# Altium PCB busanaliz2.PcbDoc (part 1 of 2)
Units mm, origin at the board's own origin, x right, y up, seen from the top; angles counter-clockwise.
Board outline 118.11 x 70.87 mm, 4 copper layers (Component Side, Ground Plane, Power Plane, Solder Side), stack 0.93 mm thick; 120 components, 93 nets, 597 pads, 207 vias.
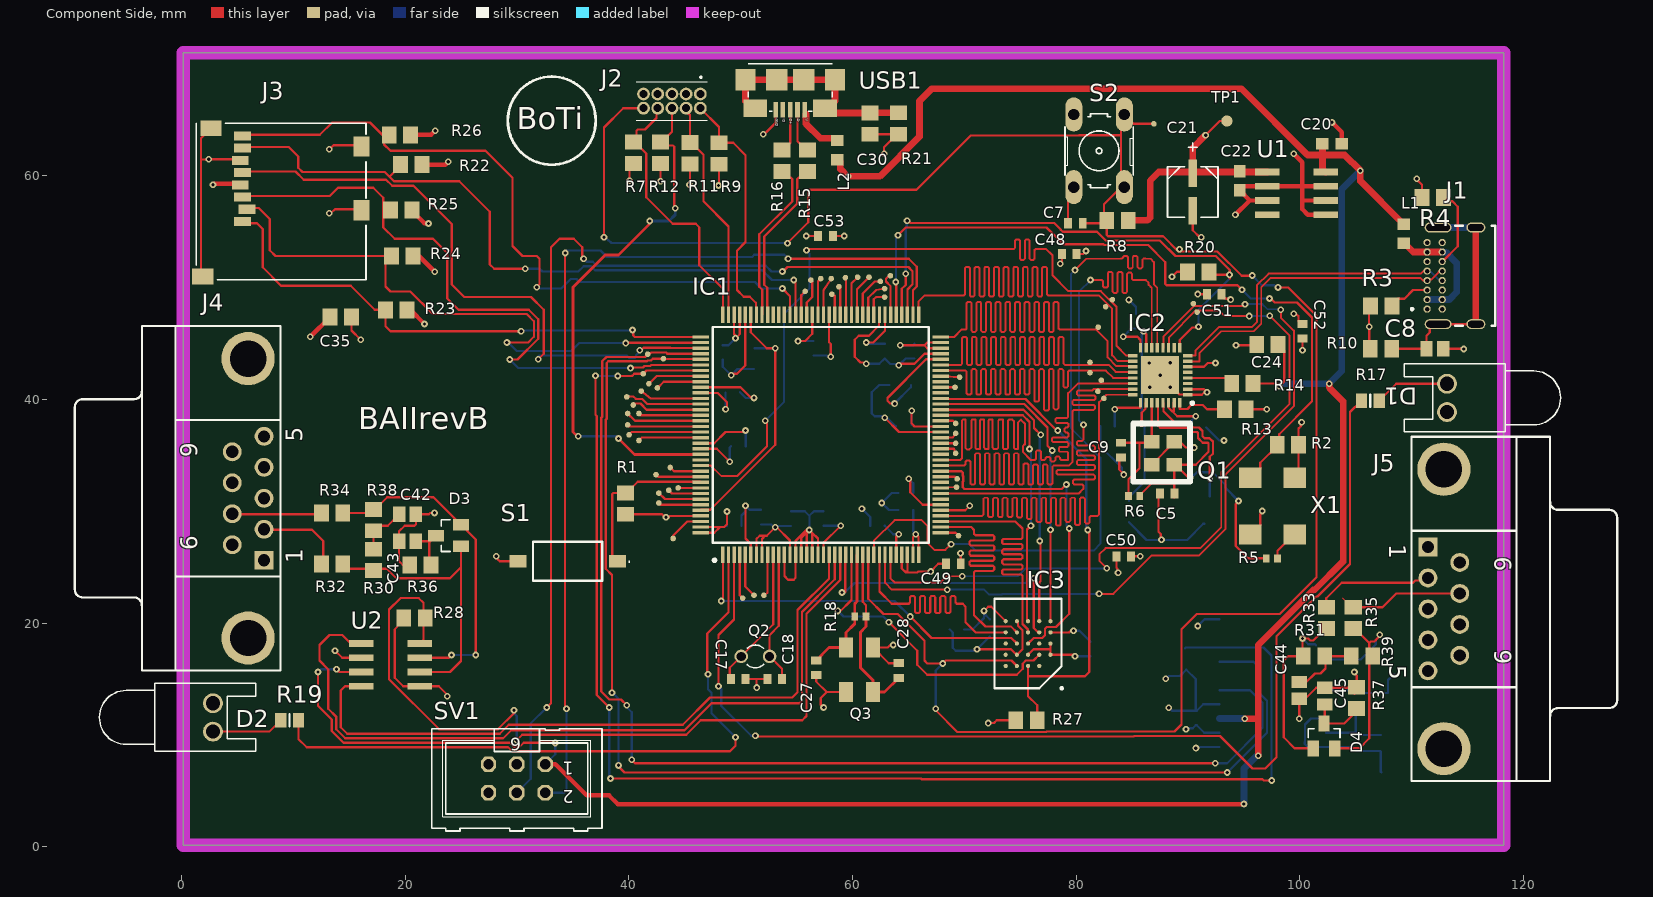
[diagram p0: Component Side view]
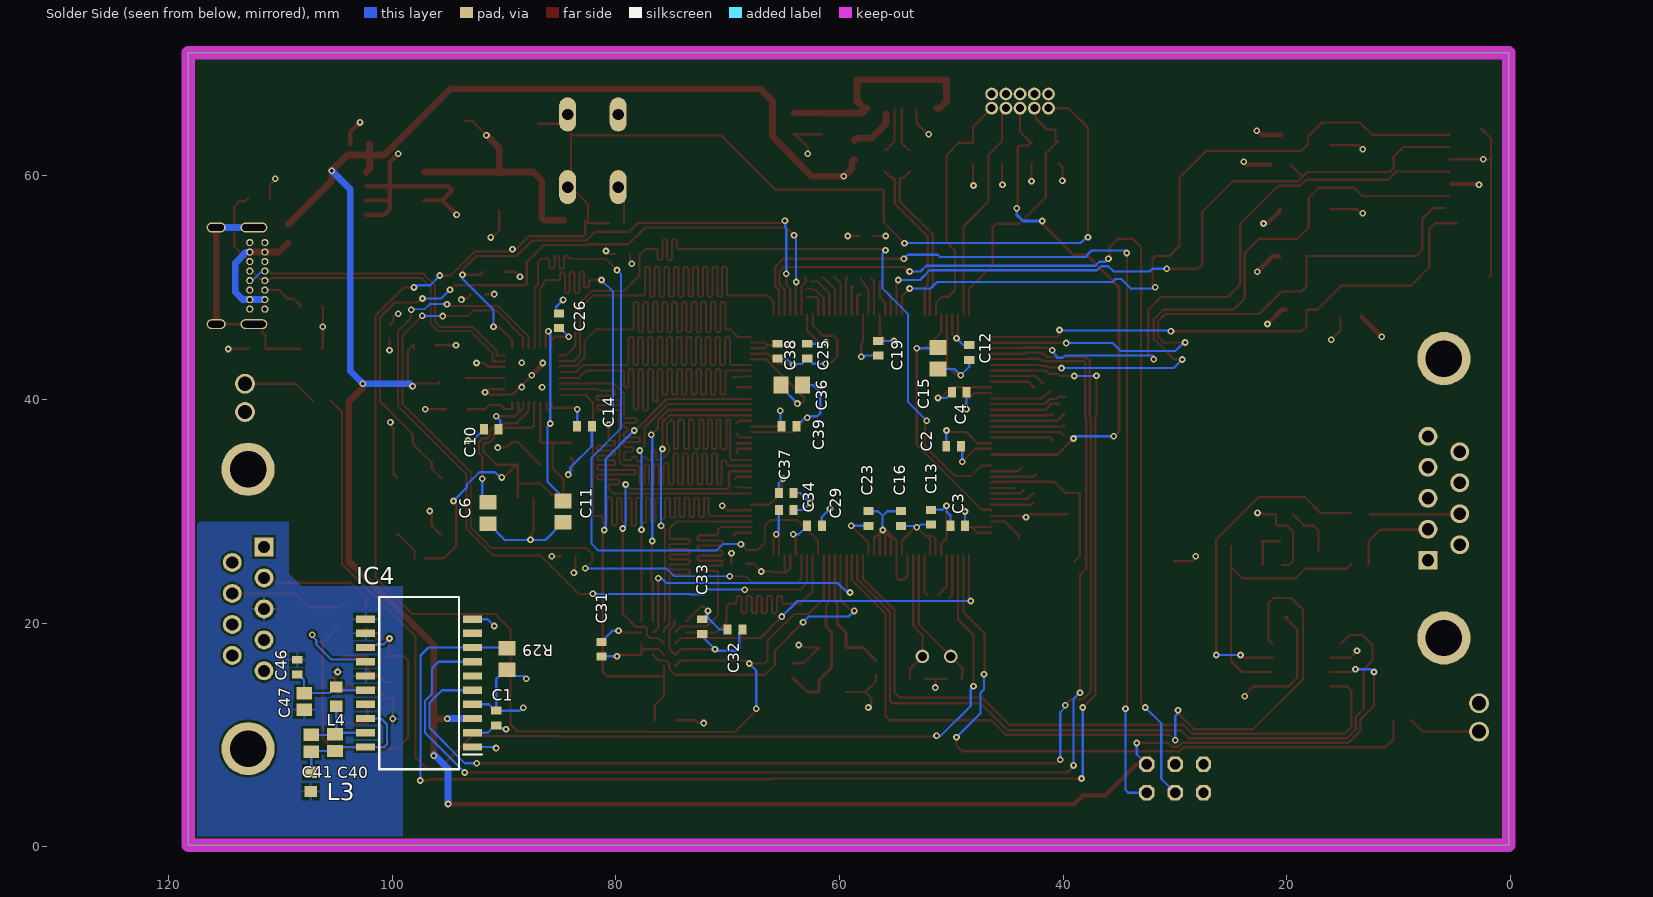
[diagram p1: Solder Side view, seen from below]
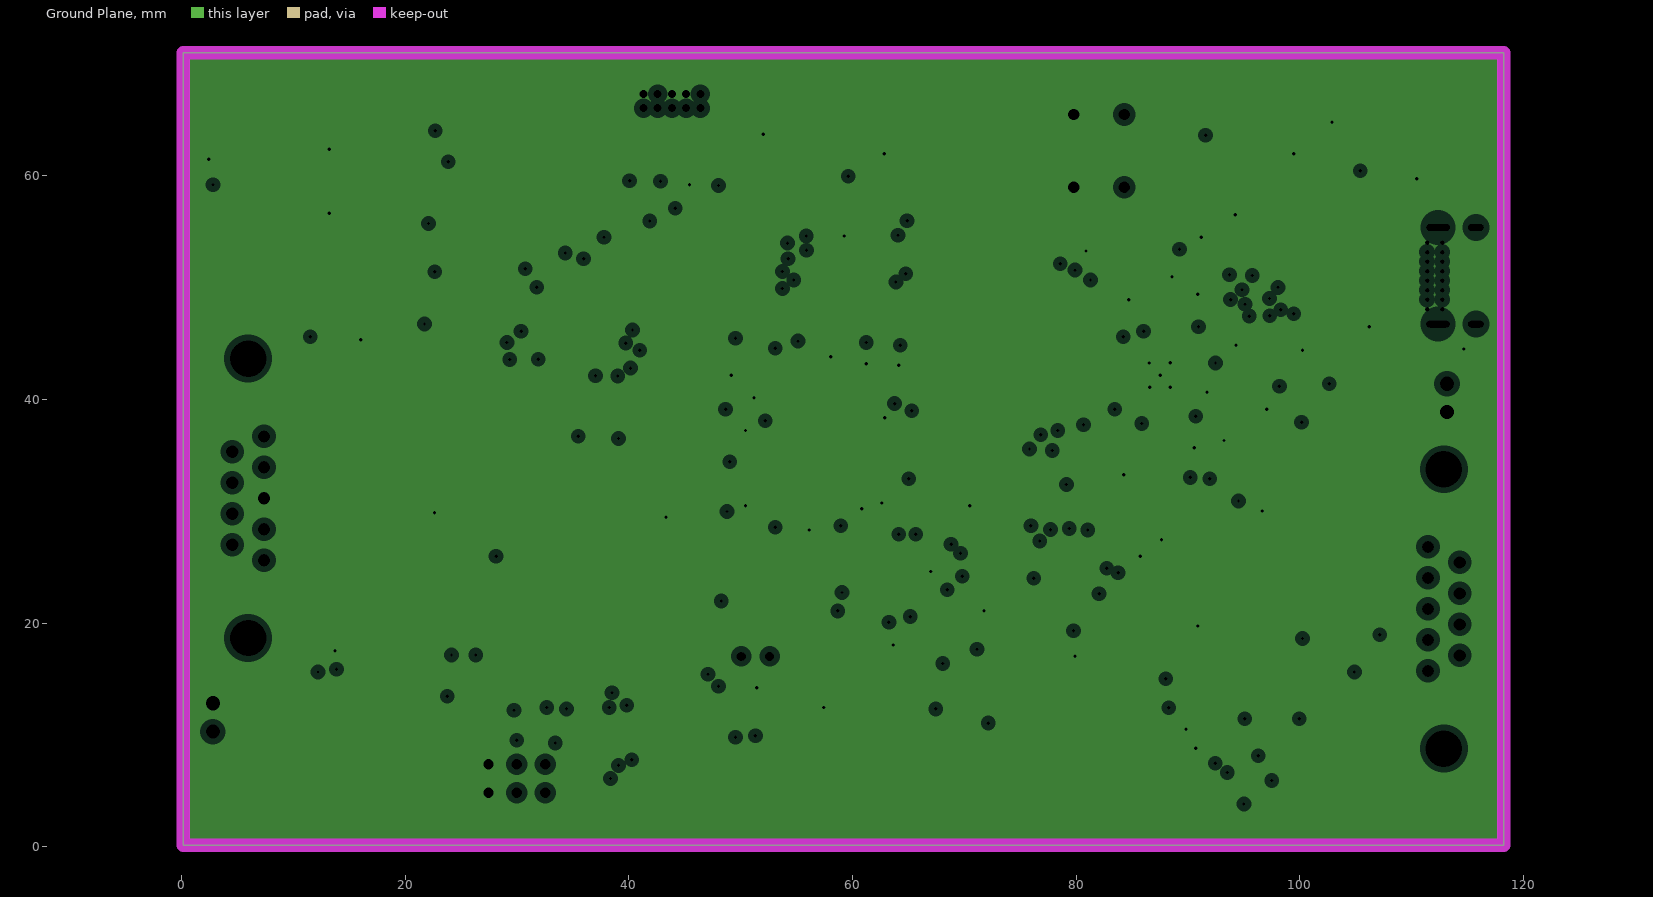
[diagram p2: Ground Plane, clearances drawn from the general rule]
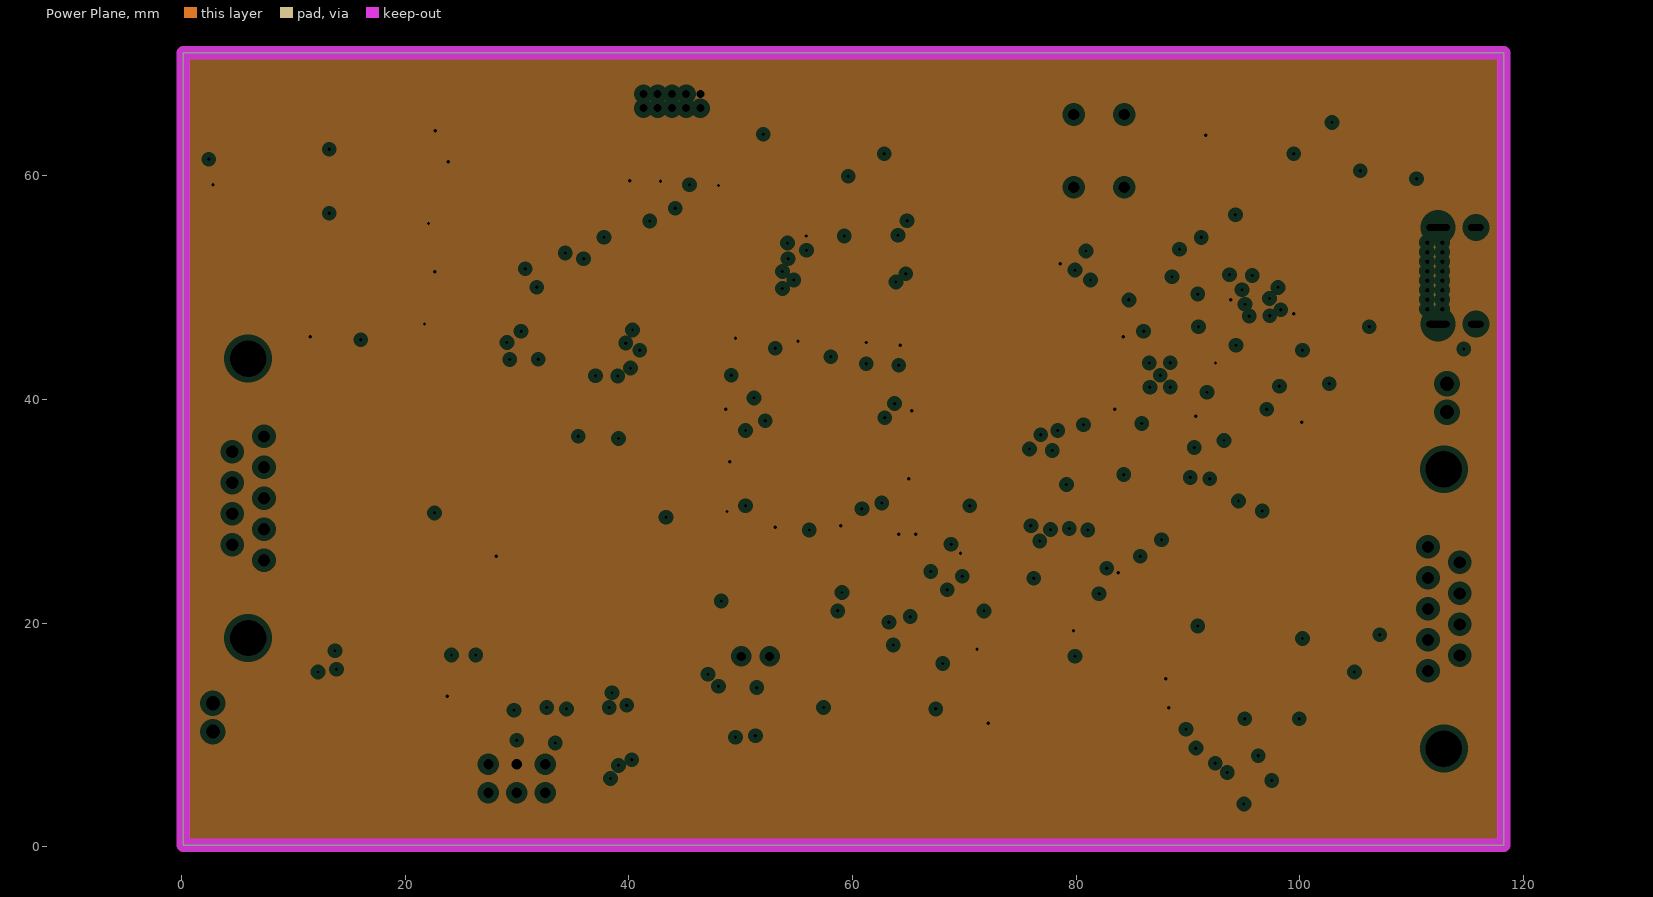
[diagram p3: Power Plane, clearances drawn from the general rule]

## Layer stack, top to bottom
Top Solder: solder mask 0.0102, Solder Resist, Dk 3.5
Component Side: signal copper 0.0525
Dielectric 1: prepreg 0.1125, PP-015, Dk 4.45
Ground Plane: plane copper 0.035, net DGND
Dielectric 3: core 0.53, Core-037, Dk 4.6
Power Plane: plane copper 0.035, net +3V3
Dielectric 4: prepreg 0.1125, PP-015, Dk 4.45
Solder Side: signal copper 0.0525
Bottom Solder: solder mask 0.0102, Solder Resist, Dk 3.5

## Board outline
0.127,0.127 118.237,0.127 118.237,70.993 0.127,70.993

## Design rules (kind name [scope] priority, off if disabled: settings)
Clearance [All] p1: gap=0.2 ignorepadtopadclearanceinfootprint=TRUE
DiffPairsRouting DiffPairsRouting_USB [InDifferentialPairClass('All Differential Pairs')] p1: maxlimit=0.24 minlimit=0.17 mostfreqgap=0.22 toplayer_minwidth=0.168 toplayer_maxwidth=0.178 toplayer_prefwidth=0.17 bottomlayer_maxgap=0.179 bottomlayer_prefgap=0.17 bottomlayer_minwidth=0.168 bottomlayer_maxwidth=0.178 bottomlayer_prefwidth=0.17 impedanceprofiledriven=TRUE impedanceprofileid={EE6C9181-D774-4A2F-AEBF-1B8C845A0D89} impedanceprofilevalue=90.000000 maxuncoupledlength=12.7
DiffPairsRouting [All] p2: maxlimit=0.254 minlimit=0.2 mostfreqgap=0.254 toplayer_minwidth=0.15 toplayer_maxwidth=0.381 toplayer_prefwidth=0.2 bottomlayer_minwidth=0.15 bottomlayer_maxwidth=0.381 bottomlayer_prefwidth=0.2 maxuncoupledlength=12.7
FabricationTestPointUsage [All] p1: valid=2 allowmultiple=TRUE
PlaneClearance [All] p1: clearance=0.508
PlaneConnect [All] p1: planeconnectstyle=Relief reliefexpansion=0.508 reliefentries=4 reliefconductorwidth=0.254 reliefairgap=0.254
PolygonConnect [All] p1: connectstyle=Relief reliefconductorwidth=0.254 reliefentries=4 polygonreliefangle="90 Angle" airgapwidth=0.254
RoutingVias [All] p1: holewidth=0.3 width=0.6 viastyle="Through Hole" minholewidth=0.3 minwidth=0.6 maxholewidth=0.3 maxwidth=0.6
SolderMaskExpansion [All] p1: expansion=0.102 istentingtop=FALSE
Width Width_s50_ulpi [InNetClass('ULPI')] p1: maxlimit=0.179 minlimit=0.168 preferedwidth=0.17 impedanceprofiledriven=TRUE impedanceprofileid={75249903-4B5E-4470-9817-DED33CB1704C} impedanceprofilevalue=50.000000 minimp=50.000000 maximp=50.000000 favimp=50.000000 checkconnectedcopper=TRUE
Width Width_s50_USB [InNetClass('USB')] p2: maxlimit=0.178 minlimit=0.168 preferedwidth=0.17 toplayer_maxwidth=0.178 impedanceprofiledriven=TRUE impedanceprofileid={75249903-4B5E-4470-9817-DED33CB1704C} impedanceprofilevalue=50.000000 minimp=50.000000 maximp=50.000000 favimp=50.000000
Width [All] p3: maxlimit=0.6 minlimit=0.2 preferedwidth=0.2 minimp=50.000000 maximp=50.000000 favimp=50.000000
26 further rules are at their usual default settings.

## Classes and differential pairs
differential pair class "New Class": D_USB_OTG_HS_D USB_FS
net class SD: SD_CLK SD_CMD SD_D0 SD_D1 SD_D2 SD_D3
net class octo: OCTO_CLK OCTO_DQS OCTO_IO0 OCTO_IO1 OCTO_IO2 OCTO_IO3 OCTO_IO4 OCTO_IO5 OCTO_IO6 OCTO_IO7 OCTO_NCS
net class ULPI: ULPI_CK ULPI_D0 ULPI_D1 ULPI_D2 ULPI_D3 ULPI_D4 ULPI_D5 ULPI_D6 ULPI_D7 ULPI_DIR ULPI_NXT ULPI_STP
differential pair USB_FS: +USB_FS_DP -USB_FS_DM
differential pair D_USB_OTG_HS_D: +USB_OTG_HS_DP -USB_OTG_HS_DM

## Components (designator, comment, footprint, x,y, rotation, side; value= is the part's Value field where it differs from the comment)
C1 "100n" C0402 90.678,11.506 r270 bottom
C2 "100n" C0402 49.784,35.814 r0 bottom
C3 "100n" C0402 49.403,28.702 r0 bottom
C4 "100n" C0402 49.276,40.64 r0 bottom
C5 "27p" C0402 88.138,31.572 r0 top
C6 "4.7u" C0805#1 91.44,29.845 r270 bottom
C7 "100n" C0402 79.934,55.753 r180 top
C8 "4.7n" C0805#2 112.078,44.526 r0 top
C9 "27p" C0402 83.998,35.458 r90 top
C10 "100n" C0402 91.132,37.323 r0 bottom
C11 "4.7u" C0805#1 84.709,29.972 r270 bottom
C12 "100n" C0402 48.387,44.196 r270 bottom
C13 "100n" C0402 51.816,29.464 r90 bottom
C14 "100n" C0402 82.804,37.592 r180 bottom
C15 "2.2u" C0805#1 51.181,43.688 r270 bottom
C16 "100n" C0402 54.483,29.337 r90 bottom
C17 "10p" C0402 49.784,14.986 r180 top
C18 "10p" C0402 53.035,14.986 r0 top
C19 "100n" C0402 56.515,44.577 r270 bottom
C20 "100n" C0603 102.87,62.865 r0 top
C21 "2.2u" CAPAE430X610N 90.424,58.547 r270 top
C22 "100n" C0603 94.615,59.563 r270 top
C23 "100n" C0402 57.404,29.337 r90 bottom
C24 "4.7u" C0805#1 97.104,44.907 r180 top
C25 "100n" C0402 62.865,44.323 r270 bottom
C26 "100n" C0402 85.065,47.015 r90 bottom
C27 "20p" C0402 56.743,16.002 r270 top
C28 "20p" C0402 64.135,15.748 r90 top
C29 "100n" C0402 62.23,28.702 r180 bottom
C30 "4.7n" C0805#1 61.544,64.668 r270 top
C31 "Capacitor" C0402 81.28,17.653 r90 bottom value=100nF
C32 "Capacitor" C0402 69.342,19.431 r180 bottom value=100nF
C33 "Capacitor" C0402 72.263,19.685 r270 bottom value=100nF
C34 "100n" C0402 64.77,30.099 r180 bottom
C35 "4.7u" C0805#1 14.224,47.371 r0 top
C36 "2.2u" C0805#1 64.262,41.275 r180 bottom
C37 "100n" C0402 64.77,31.623 r180 bottom
C38 "100n" C0402 65.532,44.323 r270 bottom
C39 "100n" C0402 64.516,37.592 r180 bottom
C40 "10u" C0805#2 105.105,9.296 r90 bottom
C41 "220n" C0805#2 107.239,9.246 r90 bottom
C42 "10n" C0805#2 20.193,29.718 r0 top
C43 "330n" C0805#2 20.193,27.305 r180 top
C44 "10n" C0805#2 99.949,13.97 r270 top
C45 "330n" C0805#2 102.235,13.462 r90 top
C46 "100n" C0402 108.483,16.053 r90 bottom
C47 "10n" C0805#2 107.874,12.979 r270 bottom
C48 "100n" C0402 79.375,53.01 r180 top (schematic designator C26)
C49 "100n" C0402 69.012,25.298 r0 top (schematic designator C26)
C50 "100n" C0402 84.252,25.959 r0 top (schematic designator C26)
C51 "100n" C0402 92.329,49.403 r0 top (schematic designator C26)
C52 "100n" C0402 100.228,46.101 r270 top (schematic designator C26)
C53 "100n" C0402 57.582,54.61 r180 top (schematic designator C26)
D1 "LED0" LED-0 113.157,40.132 r90 top
D2 "LED1" LED-0 2.794,11.557 r270 top
D3 "MMBZ27VCLT1G" SOT23 24.003,27.813 r90 top
D4 "MMBZ27VCLT1G" SOT23 102.159,9.754 r0 top
IC1 "STM32H735ZGT6" QFP50P2200X2200X160-144N 57.15,36.83 r90 top
IC2 "USB3300-EZK" QFN50P500X500X100-33N-D 87.503,42.164 r180 top
IC3 "S70KL1281DABHI023" BGA24C100P5X5_600X800X100 75.692,18.161 r180 top
IC4 "ADM3055EBRIZ-RL" SOIC127P1030X264-20N 97.587,14.63 r0 bottom
J1 "USB4085-GF-A_REVA4" GCT_USB4085-GF-A_REVA4 115.739,51.051 r90 top
J2 "FTSH-105-01-L-D-K" FTSH-105-XX-YYY-D-K 46.38,67.31 r180 top
J3 "2908-05WB-MG" CONN_3M_2900 8.89,57.683 r90 top
J4 "DB9 CAN2" DSUB1.385-2H9 -3.559,31.152 r90 top
J5 "DB9 CAN1" DSUB1.385-2H9 122.377,21.26 r270 top
L1 "WE-CBF_0603" R0603 109.296,54.813 r90 top
L2 "WE-CBF_0603" R0603 58.649,62.306 r270 top
L3 "WE-CBF_0603" R0603 107.29,5.778 r90 bottom
L4 "WE-CBF_0603" R0603 105.004,13.411 r90 bottom
Q1 "ECS-240-18-33-JEN-TR3" MCSJK-7U-24.00_1 86.741,36.195 r270 top
Q2 "32k" TC26V 51.308,17.018 r180 top
Q3 "ABM3B" ABM3B 58.801,18.723 r270 top
R1 "10k" R0805 39.675,30.683 r270 top
R2 "10k" R0805 98.933,35.941 r180 top
R3 "5.1k" R0805 107.279,48.336 r180 top
R4 "5.1k" R0805 111.887,58.039 r180 top
R5 "<B>RESISTOR</B>, European symbol" R0402 97.485,25.781 r0 top
R6 "1M" R0402 85.166,31.369 r0 top
R7 "10k" R0805 40.411,62.052 r90 top
R8 "10k" R0805 83.693,56.007 r180 top
R9 "10k" R0805 48.057,61.976 r90 top
R10 "1M" R0805 107.249,44.526 r0 top
R11 "10k" R0805 45.466,62.001 r90 top
R12 "10k" R0805 42.824,62.052 r90 top
R13 "12k" R0805 94.234,39.116 r180 top
R14 "10k" R0805 94.869,41.427 r180 top
R15 "10" R0805 55.956,61.341 r270 top
R16 "10" R0805 53.67,61.341 r270 top
R17 "Res2" 6-0805_L 106.299,39.878 r0 top value=100
R18 "1M" R0402 60.706,20.574 r180 top
R19 "Res2" 6-0805_L 9.652,11.303 r180 top value=100
R20 "10k" R0805 90.907,51.41 r0 top
R21 "1M" R0805 64.084,64.668 r90 top
R22 "47k" R0805 20.523,60.985 r0 top
R23 "47k" R0805 19.177,48.006 r0 top
R24 "47k" R0805 19.71,52.807 r0 top
R25 "47k" R0805 19.634,56.947 r0 top
R26 "47k" R0805 19.507,63.652 r0 top
R27 "10k" R0805 75.565,11.303 r180 top
R28 "Res2" R0805 20.828,20.462 r180 top value=3.3k
R29 "Res2" R0805 89.738,16.789 r270 bottom value=3.3k
R30 "Res2" R0805 17.145,25.654 r270 top value=62
R31 "Res2" R0805 101.27,17.069 r180 top value=62
R32 "Res2" R0805 13.462,25.273 r180 top value=0.100
R33 "Res2" R0805 102.362,20.447 r90 top value=0.100
R34 "Res2" R0805 13.462,29.845 r180 top value=0.100
R35 "Res2" R0805 104.775,20.447 r90 top value=0.100
R36 "Res2" R0805 21.336,25.199 r0 top value=470k
R37 "Res2" R0805 105.08,13.31 r270 top value=470k
R38 "Res2" R0805 17.145,29.21 r270 top value=62
R39 "Res2" R0805 105.562,17.069 r180 top value=62
S1 "A6S-1102-H" A6S1102H 34.519,25.527 r90 top
S2 "10-XX" B3F-10XX 82.042,62.23 r90 top
SV1 "ML6" ML6 29.972,6.096 r180 top
TP1 "TPB2,54" B2,54 93.472,64.897 r90 top
U1 "KF33D" SO8#1 99.695,58.42 r270 top
U2 "TJA1044" SO8#2 18.796,16.129 r270 top
USB1 "USB_MICROB" USB_MICROB_PACKAGE 54.432,65.233 r180 top
X1 "Abracon ASV 24.000 MHz 3.3 V HCMOS oscillator. Pin 1 EN is active high: high or open enables output; low tri-states output. Pin 2 GND/case, pin 3 output, pin 4 VDD." ASV_7x5-08mm 97.555,30.455 r270 top

## Footprints (in the part's own frame and the unit in brackets; to place one, negate y for a bottom-side part, rotate by r counter-clockwise, add the part's x,y. Pads: shape width x height; smd on the part's side, far side on the other; paste and mask are expansions set on the pad)
6-0805_L [mm] "Chip Resistor, Body 2.0x1.2mm, IPC High Density"
  rect 1x1.3 smd: 1(-0.8,0) 2(0.8,0)
  silkscreen extent 0,-0.55 0,0.55, body extent -1.07,-0.7 1.07,0.7, height 0.7
A6S1102H [mm]
  rect 1.1x1.5 smd: 1(0,-4.45) 2(0,4.45)
  silkscreen extent -1.74,-5.55 1.74,3.1, body extent -1.74,-4.9 1.74,4.9, height 3.15
ABM3B [mil]
  rect 71x48 smd: P$1(36,24) P$2(193,24) P$3(193,119) P$4(36,119)
ASV_7x5-08mm [mm]
  rect 1.8x2 smd: 1(-2.54,-2) 2(2.54,-2) 3(2.54,2) 4(-2.54,2)
B2,54 [mm]
  rrect100% 1x1 smd: TP(0,0)
B3F-10XX [mil]
  oval 120x60 hole 40: 1(-128,89) 2(128,89) 3(-128,-89) 4(128,-89)
  silkscreen extent -130,-120 130,120
BGA24C100P5X5_600X800X100 [mm]
  round 0.37 smd: A2(-1,2) A3(0,2) A4(1,2) A5(2,2) B1(-2,1) B2(-1,1) B3(0,1) B4(1,1) B5(2,1) C1(-2,0) C2(-1,0) C3(0,0) C4(1,0) C5(2,0) D1(-2,-1) D2(-1,-1) D3(0,-1) D4(1,-1) D5(2,-1) E1(-2,-2) E2(-1,-2) E3(0,-2) E4(1,-2) E5(2,-2)
  silkscreen extent -3.1,-4 3,4.1, body extent -3,-4 3,4, height 1
C0402 [mil]
  rect 28x36 smd: 1(-25.59,0) 2(26,0)
C0603 [mil]
  rect 44x40 smd: 1(-33.46,0) 2(34,0)
C0805#1 [mil]
  rect 52x60 smd: 1(-37.4,0) 2(38,0)
C0805#2 [mil] "Chip Capacitor, Body 2.0x1.3mm, IPC High Density"
  rect 43.31x55.12 smd: 1(-29.53,0) 2(29.53,0)
  body extent -43,-29 43,29, height 55
CAPAE430X610N [mil]
  rect 97x30 smd: 1(-66,0) 2(66,0)
  silkscreen extent -173,-89 89,89
CONN_3M_2900 [mil]
  rect 32x59 smd: 1(-69.76,135.78) 2(-26.76,119.78) 3(16.24,135.78) 4(59.24,143.78) 5(102.24,135.78) 6(145.24,143.78) 7(188.24,135.78) 8(231.24,135.78)
  rect 55x75 smd: 9(-263.5,275.5) 10(257.9,247.1)
  rect 71x55 smd: 11(-30.5,-283) 12(194.5,-283)
  silkscreen extent -276,-299 276,299, body extent 0,0 10,10, height 10
DSUB1.385-2H9 [mm] "Connector; D Subminiature; 9 Position; Right Angle; Pitch 1.385 mm"
  rect 1.69x1.69 hole 1.09: 1(-5.54,-10.92)
  round 1.69 hole 1.09: 2(-2.77,-10.92) 3(0,-10.92) 4(2.77,-10.92) 5(5.54,-10.92) 6(-4.155,-8.08) 7(-1.385,-8.08) 8(1.385,-8.08) 9(4.155,-8.08)
  round 4.76 hole 3.26: 10(-12.495,-9.5) 11(12.495,-9.5)
  silkscreen extent -15.4,-12.4 15.4,6
FTSH-105-XX-YYY-D-K [mm]
  round 1.15 hole 0.71: 1(0,0) 2(0,1.27) 3(1.27,0) 4(1.27,1.27) 5(2.54,0) 6(2.54,1.27) 7(3.81,0) 8(3.81,1.27) 9(5.08,0) 10(5.08,1.27)
  silkscreen extent -0.64,-1.55 5.71,2.35, body extent -0.64,-1.25 5.71,2.18, height 5.78
GCT_USB4085-GF-A_REVA4 [mm]
  round 0.65 hole 0.4: A1(-2.975,4.36) A4(-2.125,4.36) A5(-1.275,4.36) A6(-0.425,4.36) A7(0.425,4.36) A8(1.275,4.36) A9(2.125,4.36) A12(2.975,4.36) B1(2.975,3.01) B4(2.125,3.01) B5(1.275,3.01) B6(0.425,3.01) B7(-0.425,3.01) B8(-1.275,3.01) B9(-2.125,3.01) B12(-2.975,3.01)
  oval 0.9x1.7 hole 0.6 slot 1.4 at 90 deg: S1(-4.325,0) S2(4.325,0)
  oval 0.9x2.4 hole 0.6 slot 2.1 at 90 deg: S3(-4.325,3.38) S4(4.325,3.38)
  silkscreen extent -4.47,-1.74 4.47,5.8, body extent -4.47,-4.25 4.47,4.92, height 3.46
LED-0 [mil] "LED; 2 Leads"
  round 70 hole 50: 1(50,0) 2(-50,0)
  silkscreen extent -120,-400 120,150
MCSJK-7U-24.00_1 [mm]
  rect 1.2x1.4 smd: 1(0,0) 2(2.032,0) 3(2.032,2.032) 4(0,2.032)
  silkscreen extent -1.65,-1.65 3.56,3.43
ML6 [mil]
  oct 54x54 hole 36: 1(-100,-50) 2(-100,50) 3(0,-50) 4(0,50) 5(100,-50) 6(100,50)
  silkscreen extent -300,-175 300,185
QFN50P500X500X100-33N-D [mm]
  rect 0.85x0.3 smd: 1(-2.45,1.75) 2(-2.45,1.25) 3(-2.45,0.75) 4(-2.45,0.25) 5(-2.45,-0.25) 6(-2.45,-0.75) 7(-2.45,-1.25) 8(-2.45,-1.75) 17(2.45,-1.75) 18(2.45,-1.25) 19(2.45,-0.75) 20(2.45,-0.25) 21(2.45,0.25) 22(2.45,0.75) 23(2.45,1.25) 24(2.45,1.75)
  rect 0.3x0.85 smd: 9(-1.75,-2.45) 10(-1.25,-2.45) 11(-0.75,-2.45) 12(-0.25,-2.45) 13(0.25,-2.45) 14(0.75,-2.45) 15(1.25,-2.45) 16(1.75,-2.45) 25(1.75,2.45) 26(1.25,2.45) 27(0.75,2.45) 28(0.25,2.45) 29(-0.25,2.45) 30(-0.75,2.45) 31(-1.25,2.45) 32(-1.75,2.45)
  rect 3.4x3.4 smd: 33(0,0)
  silkscreen extent -3,2.38 -2.75,2.62, body extent -2.55,-2.55 2.55,2.55, height 1
QFP50P2200X2200X160-144N [mm]
  rect 1.475x0.3 smd: 1(-10.738,8.75) 2(-10.738,8.25) 3(-10.738,7.75) 4(-10.738,7.25) 5(-10.738,6.75) 6(-10.738,6.25) 7(-10.738,5.75) 8(-10.738,5.25) 9(-10.738,4.75) 10(-10.738,4.25) 11(-10.738,3.75) 12(-10.738,3.25) 13(-10.738,2.75) 14(-10.738,2.25) 15(-10.738,1.75) 16(-10.738,1.25) 17(-10.738,0.75) 18(-10.738,0.25) 19(-10.738,-0.25) 20(-10.738,-0.75) 21(-10.738,-1.25) 22(-10.738,-1.75) 23(-10.738,-2.25) 24(-10.738,-2.75) 25(-10.738,-3.25) 26(-10.738,-3.75) 27(-10.738,-4.25) 28(-10.738,-4.75) 29(-10.738,-5.25) 30(-10.738,-5.75) 31(-10.738,-6.25) 32(-10.738,-6.75) 33(-10.738,-7.25) 34(-10.738,-7.75) 35(-10.738,-8.25) 36(-10.738,-8.75) 73(10.738,-8.75) 74(10.738,-8.25) 75(10.738,-7.75) 76(10.738,-7.25) 77(10.738,-6.75) 78(10.738,-6.25) 79(10.738,-5.75) 80(10.738,-5.25) 81(10.738,-4.75) 82(10.738,-4.25) 83(10.738,-3.75) 84(10.738,-3.25) 85(10.738,-2.75) 86(10.738,-2.25) 87(10.738,-1.75) 88(10.738,-1.25) 89(10.738,-0.75) 90(10.738,-0.25) 91(10.738,0.25) 92(10.738,0.75) 93(10.738,1.25) 94(10.738,1.75) 95(10.738,2.25) 96(10.738,2.75) 97(10.738,3.25) 98(10.738,3.75) 99(10.738,4.25) 100(10.738,4.75) 101(10.738,5.25) 102(10.738,5.75) 103(10.738,6.25) 104(10.738,6.75) 105(10.738,7.25) 106(10.738,7.75) 107(10.738,8.25) 108(10.738,8.75)
  rect 0.3x1.475 smd: 37(-8.75,-10.738) 38(-8.25,-10.738) 39(-7.75,-10.738) 40(-7.25,-10.738) 41(-6.75,-10.738) 42(-6.25,-10.738) 43(-5.75,-10.738) 44(-5.25,-10.738) 45(-4.75,-10.738) 46(-4.25,-10.738) 47(-3.75,-10.738) 48(-3.25,-10.738) 49(-2.75,-10.738) 50(-2.25,-10.738) 51(-1.75,-10.738) 52(-1.25,-10.738) 53(-0.75,-10.738) 54(-0.25,-10.738) 55(0.25,-10.738) 56(0.75,-10.738) 57(1.25,-10.738) 58(1.75,-10.738) 59(2.25,-10.738) 60(2.75,-10.738) 61(3.25,-10.738) 62(3.75,-10.738) 63(4.25,-10.738) 64(4.75,-10.738) 65(5.25,-10.738) 66(5.75,-10.738) 67(6.25,-10.738) 68(6.75,-10.738) 69(7.25,-10.738) 70(7.75,-10.738) 71(8.25,-10.738) 72(8.75,-10.738) 109(8.75,10.738) 110(8.25,10.738) 111(7.75,10.738) 112(7.25,10.738) 113(6.75,10.738) 114(6.25,10.738) 115(5.75,10.738) 116(5.25,10.738) 117(4.75,10.738) 118(4.25,10.738) 119(3.75,10.738) 120(3.25,10.738) 121(2.75,10.738) 122(2.25,10.738) 123(1.75,10.738) 124(1.25,10.738) 125(0.75,10.738) 126(0.25,10.738) 127(-0.25,10.738) 128(-0.75,10.738) 129(-1.25,10.738) 130(-1.75,10.738) 131(-2.25,10.738) 132(-2.75,10.738) 133(-3.25,10.738) 134(-3.75,10.738) 135(-4.25,10.738) 136(-4.75,10.738) 137(-5.25,10.738) 138(-5.75,10.738) 139(-6.25,10.738) 140(-6.75,10.738) 141(-7.25,10.738) 142(-7.75,10.738) 143(-8.25,10.738) 144(-8.75,10.738)
  silkscreen extent -11.35,-9.65 9.65,9.65, body extent -11,-11 11,11, height 1.6
R0402 [mil]
  rect 24x28 smd: 1(-19.69,0) 2(20,0)
R0603 [mil]
  rect 40x44 smd: 1(-33.46,0) 2(34,0)
R0805 [mil]
  rect 52x60 smd: 1(-37.4,0) 2(38,0)
SO8#1 [mil]
  rect 24x87 smd: 1(-75,-102.36) 2(-25,-102.36) 3(25,-102.36) 4(75,-102.36) 5(75,103) 6(25,103) 7(-25,103) 8(-75,103)
SO8#2 [mil]
  rect 24x87 smd: 1(-80,-107.36) 2(-30,-107.36) 3(20,-107.36) 4(70,-107.36) 5(70,98) 6(20,98) 7(-30,98) 8(-80,98)
SOIC127P1030X264-20N [mm]
  rect 1.7x0.65 smd: 1(-4.775,5.715) 2(-4.775,4.445) 3(-4.775,3.175) 4(-4.775,1.905) 5(-4.775,0.635) 6(-4.775,-0.635) 7(-4.775,-1.905) 8(-4.775,-3.175) 9(-4.775,-4.445) 10(-4.775,-5.715) 11(4.775,-5.715) 12(4.775,-4.445) 13(4.775,-3.175) 14(4.775,-1.905) 15(4.775,-0.635) 16(4.775,0.635) 17(4.775,1.905) 18(4.775,3.175) 19(4.775,4.445) 20(4.775,5.715)
  silkscreen extent -5.63,-7.7 3.57,7.7, body extent -5.15,-7.7 5.15,7.7, height 2.64
SOT23 [mil]
  rect 40x56 smd: 1(-37.4,-38.31) 2(38,-38.31) 3(0,49)
  silkscreen extent -56,-1 56,31
TC26V [mil]
  round 48 hole 32: 1(-50,0) 2(50,0)
  silkscreen extent -28,-40 29,40
USB_MICROB_PACKAGE [mil]
  rect 16x54 smd: D+(0,-26.77) D-(-25.2,-26.77) GND(52,-26.77) ID(26,-26.77) V(-51.18,-26.77)
  rect 83x63 smd: PAD1(-122.05,-31.5) PAD2(123,-31.5)
  rect 71x75 smd: PAD3(-157.48,-131.89) PAD6(158,-131.89)
  rect 75x75 smd: PAD4(-47.24,-131.89) PAD5(48,-131.89)
  silkscreen extent -148,-189 148,-22

## Part data
C1 C2 C3 C4 C5 C6 C7 C9 C10 C11 C12 C13 C14 C15 C16 C17 C18 C19 C23 C24 C25 C26 C27 C28 C29 C34 C35 C36 C37 C38 C39 C40 C41 C42 C43 C44 C45 C46 C47 C48 C49 C50 C51 C52 C53: library part C-EUC0402, "<B>CAPACITOR</B>, European symbol", SPICEPREFIX=C
C8 C30: library part C-EUC0805, "<B>CAPACITOR</B>, European symbol", SPICEPREFIX=C
C20 C22: library part C-EUC0603, "<B>CAPACITOR</B>, European symbol", SPICEPREFIX=C
C21: library part EEE--CASE-B, MPN=EEE-FT0J101AR, Package=CASE-B, TOLERANCE="±20 %", VOLTAGERATING=6.3V, OC_FARNELL=2065951, OC_NEWARK=73T9146, SUPPLIER=PANASONIC
C31 C32 C33: library part MCD-00102, "Capacitor, MLCC, 100nF, 16V, X7R, 10%, 0402, T=0,5mm", Alternate_Manufacturer=MURATA, Alternate_Manufacturer_Part_Number=GCM155R71C104KA55D, Manufacturer=YAGEO, Manufacturer_Part_Number=CC0402KRX7R7BB104, Package=C0402, ComponentLink1Description=Datasheet, ComponentLink1URL=http://tunmcdsvn.tun.st.com/Component_Datasheet_Library/Trunk/Capacitors/Yageo_Multilayer_Capacitor_X7R_series_100pF_to_22uF, ECCN_EU=NEC, ECCN_US=EAR99, Internal_Part_Number=MCD-00102, Part_Type=Capacitor, Provided_By=SUBCO, Status=Released
D1: "Typical INFRARED GaAs LED", LatestRevisionDate=08-Jul-2005, LatestRevisionNote="Mech Layer 1 removed.", PackageDescription="LED; 2 Leads", PackageReference=LED-0, Published=8-Jun-2000, Publisher="Altium Limited"
D2: library part LED0, "Typical INFRARED GaAs LED", LatestRevisionDate=08-Jul-2005, LatestRevisionNote="Mech Layer 1 removed.", PackageDescription="LED; 2 Leads", PackageReference=LED-0, Published=8-Jun-2000, Publisher="Altium Limited"
IC1: "Integrated Circuit", Manufacturer_Name=STMicroelectronics, Datasheet Link=https://www.st.com/resource/en/datasheet/stm32h735zg.pdf, Height=1.6mm, Manufacturer_Part_Number=STM32H735ZGT6
IC2: "Integrated Circuit", Manufacturer_Name=Microchip, Mouser2 Part Number=886-USB3300-EZK, Datasheet Link=https://componentsearchengine.com//USB3300-EZK.pdf, Height=1mm, Manufacturer_Part_Number=USB3300-EZK, Mouser2 Price/Stock=https://www.mouser.com/Search/Refine.aspx?Keyword=886-USB3300-EZK
IC3: "Integrated Circuit", Manufacturer_Name="Cypress Semiconductor", Datasheet Link=https://www.cypress.com/file/183506/download, Height=1mm, Manufacturer_Part_Number=S70KL1281DABHI023
IC4: "Integrated Circuit", Manufacturer_Name="Analog Devices", Mouser Part Number=584-ADM3055EBRIZ-RL, Arrow Part Number=ADM3055EBRIZ-RL, Arrow Price/Stock=https://www.arrow.com/en/products/adm3055ebriz-rl/analog-devices.html?utm_currency=USD&region=asia, Datasheet Link=https://www.analog.com/media/en/technical-documentation/data-sheets/ADM3055E-3057E.pdf, Height=2.64mm, Manufacturer_Part_Number=ADM3055EBRIZ-RL, Mouser Price/Stock=https://www.mouser.co.uk/ProductDetail/Analog-Devices/ADM3055EBRIZ-RL?qs=qSfuJ%252Bfl%2Fd7r0f9T4vdNWQ%3D%3D
J1: "USB-C (USB TYPE-C) USB 2.0 Receptacle Connector 24 (16+8 Dummy) Position Through Hole, Right Angle, low cost, 3.46mm profile, 16 pin, horizontal, Top mount", Package=None, Availability="In Stock", Check_prices=https://www.snapeda.com/parts/USB4085-GF-A/Global+Connector+Technology/view-part/?ref=eda, MF="Global Connector Technology", MP=USB4085-GF-A, Price=None, Purchase-URL=https://pricing.snapeda.com/search/part/USB4085-GF-A/?ref=eda, SnapEDA_Link=https://www.snapeda.com/parts/USB4085-GF-A/Global+Connector+Technology/view-part/?ref=snap
J2: "Connector", Manufacturer_Name=SAMTEC, Mouser Part Number=200-FTSH10501LDK, Arrow Part Number=FTSH-105-01-L-D-K, Arrow Price/Stock=https://www.arrow.com/en/products/ftsh-105-01-l-d-k/samtec.html?utm_currency=USD&region=europe, Datasheet Link=http://suddendocs.samtec.com/prints/ftsh-1xx-xx-xxx-d-xxx-xx-mkt.pdf, Manufacturer_Part_Number=FTSH-105-01-L-D-K, Mouser Price/Stock=https://www.mouser.co.uk/ProductDetail/Samtec/FTSH-105-01-L-D-K?qs=92ilVni64gxM4uHHuRbswg%3D%3D
J3: "No Description Available", Built_By=EMA_UL_Team, Copyright="Copyright (C) 2018 Accelerated Designs. All rights reserved", Manufacturer_Part_Number=2908-05WB-MG, RefDes=RefDes, SourceLibrary=OnlineOrders_2014-07-19, Type=DEV, VENDOR=3M
J4 J5: library part "D Connector 9", "Receptacle Assembly, 9 Position, Right Angle", PackageDocument=O, DatasheetDocument=1-Sep-1999, Gender=Receptacle, LatestRevisionDate=17-Jul-2002, LatestRevisionNote="Re-released for DXP Platform.", Orientation="Right Angle", PackageReference=788750, Positions=9, Published=15-Jun-2001, Publisher="Altium Limited"
L1: "<b> SMD EMI Suppression Ferrite Beads WE-CBF</b> <p> /  / - Excellent anti-EMI properties <br> / - Low DC-restistance <br> / - Impedances till 3000 ohms <br> / - Rated current up to 6 A<p> /  / -- Reliable Ni-Sn electrodes<br> / -- Perfect as data lined filter and for uncoupling of distribution voltage<br>", MPN=742792695, Package=IND-0603, OC_FARNELL=1635699, OC_NEWARK=08P2449, SUPPLIER="Wuerth Elektronik"
L2 L3 L4: "<b> SMD EMI Suppression Ferrite Beads WE-CBF</b> <p> /  / - Excellent anti-EMI properties <br> / - Low DC-restistance <br> / - Impedances till 3000 ohms <br> / - Rated current up to 6 A<p> /  / -- Reliable Ni-Sn electrodes<br> / -- Perfect as data lined filter and for uncoupling of distribution voltage<br>", MPN=742792693, Package=IND-0603, OC_FARNELL=742792693, OC_NEWARK=08P2449, SUPPLIER="Wuerth Elektronik"
Q1: library part MCSJK-7U-24.00_1, "same footprint as MCSJK-7U-24.00_1"
Q2: library part CRYSTALTC26V, "<b>CRYSTAL</b>", 1=1, 2=2, OC_FARNELL=unknown, OC_NEWARK=unknown
R1 R2 R3 R4 R7 R8 R9 R10 R11 R12 R15 R16 R21 R22 R23 R24 R25 R26 R27: library part R-EU_R0805, "<B>RESISTOR</B>, European symbol"
R5 R6: library part R-EU_R0402, SPICEPREFIX=R
R13 R14 R20: library part R-EU_R0805, SPICEPREFIX=R
R17 R19 R28 R29 R30 R31 R32 R33 R34 R35 R36 R37 R38 R39: "Resistor", LatestRevisionDate=17-Jul-2002, LatestRevisionNote="Re-released for DXP Platform.", PackageDescription="Axial Device, Thru-Hole; 2 Leads; 0.4 in Pin Spacing", PackageReference=AXIAL-0.4, Published=8-Jun-2000, Publisher="Altium Limited"
R18: library part R-EU_R0402, "<B>RESISTOR</B>, European symbol"
S1: "Switch", Manufacturer_Name="OMRON Electronics", Mouser Part Number=653-A6S-1102-H, Arrow Part Number=A6S-1102-H, Arrow Price/Stock=https://www.arrow.com/en/products/a6s1102h/omron?region=nac, Datasheet Link=https://components.omron.com/us-en/sites/components.omron.com.us/files/datasheet_pdf/A211-E1.pdf, Height=3.8mm, Manufacturer_Part_Number=A6S-1102-H, Mouser Price/Stock=https://www.mouser.co.uk/ProductDetail/Omron-Electronics/A6S-1102-H?qs=FFtkVBg2Ai6emF35RthuRw%3D%3D
S2: "<b>OMRON SWITCH</b>", MPN=B3F-1000, OC_FARNELL=176432, OC_NEWARK=36M3542
SV1: "<b>HARTING</b>", OC_FARNELL=unknown, OC_NEWARK=unknown
TP1: "<b>Test pad</b>"
USB1: "This is the hirose ZX62-B-5PA(11) MICRO-USB B Type female connection.", USB=USB
X1: library part ASV-24.000MHZ-EJ-T, Package=ASV_7x5.08mm, DeviceSetName=ASV-24.000MHZ-EJ-T, GateName_1=G$1, LibraryName=ASV-24.000MHZ-EJ-T, SymbolName_1=ASV_OSCILLATOR

## Free pads (board coordinates)
  round 0.5 smd: 20(63.373,51.054) 22(62.865,49.149) 23(62.865,49.911) 24(62.484,50.546) 25(61.468,50.927) 26(60.452,50.927) 27(59.355,50.882) 28(58.774,50.077) 29(58.141,49.403) 30(58.09,50.8) 31(57.15,50.8) 32(56.261,50.673) 33(55.753,49.657) 34(41.676,44.044) 35(43.078,43.637) 38(69.571,41.986) 39(69.156,41.08) 40(69.215,37.846) 41(69.215,36.957) 42(69.215,36.068) 43(69.215,35.179) 44(69.342,32.893) 45(69.291,32.156) 46(69.469,27.813) 47(52.07,22.479) 48(50.165,22.225) 49(51.181,22.479) 50(43.942,27.559) 51(42.672,30.734) 52(42.672,31.623) 53(43.561,31.877) 54(44.399,32.08) 55(42.418,33.274) 56(43.688,33.909) 57(40.894,36.322) 58(40.005,36.83) 59(39.878,37.719) 60(39.878,38.735) 61(40.894,38.735) 62(40.386,39.497) 63(39.802,40.221) 64(41.097,40.742) 65(42.545,41.021) 66(41.783,41.402) 67(41.275,42.291) 68(86.944,64.643) 69(81.229,42.393) 69(81.229,43.307) 69(81.94,40.716) 69(81.966,46.457) 69(82.245,41.707) 69(82.471,40.086) 69(82.626,48.285) 69(83.236,48.92) 69(90.475,48.565) 69(90.805,47.803)

## Via types
v1: diameter 0.6, hole 0.3, Component Side to Solder Side, 207 vias

## Nets (pads, with @x,y where several pads share a name; then routed paths per layer and width w, separated by ;. In a path a pad name is that pad's centre, name@x,y a point inside that pad or via, vN(x,y) a via of type N, cw(c..) or ccw(c..) an arc to the next point about the centre after c; other vN are vias at no path point)
+3V3: C1.1 C2.1 C3.1 C4.1 C10.1 C12.1 C13.1 C14.1 C16.1 C19.1 C21.1 C22.1 C23.1 C25.1 C26.1 C29.1 C31.2 C32.2 C33.2 C34.1 C35.1 C37.1 C38.1 C39.1 C48.2 C49.2 C50.1 C51.2 C52.1 C53.2 IC1.7 IC1.8 IC1.13 IC1.19 IC1.32 IC1.35 IC1.36 IC1.42 IC1.56 IC1.70 IC1.71 IC1.79 IC1.92 IC1.105 IC1.106 IC1.119 IC1.129 IC1.143 IC1.144 IC2.6 IC2.16 IC2.25 IC2.30 IC2.31 IC3.B4 IC3.D1 IC3.E4 IC4.4 J2.1 J3.4 R2.1 R7.1 R8.1 R9.1 R12.1 R22.2 R23.2 R24.2 R25.2 R26.2 R27.2 R28.2 R29.2 S1.2 SV1.3 TP1.TP U1.1 U2.5 X1.4 | length 191.2
  Component Side w0.2: R28.2@20.028,20.409 19.05,19.431 19.05,15.113 19.812,14.351 U2.5@21.285,14.351 22.987,14.351 23.749,13.589 v1(23.749,13.462) ; v1(28.118,25.959) 28.118,25.851 28.319,25.65 28.319,25.644 28.436,25.527 S1.2@30.069,25.527 ; v1(40.056,59.563) 40.056,60.747 R7.1@40.411,61.102 ; v1(42.824,59.512) R12.1@42.824,61.102 ; IC1.144@46.412,28.08 47.638,28.08 48.138,28.58 ; IC1.143@46.412,28.58 48.138,28.58 ; IC1.129@46.412,35.58 47.859,35.58 v1(49.022,34.417) ; IC1.119@46.412,40.58 47.939,40.58 48.768,39.751 48.768,39.243 v1(48.641,39.116) ; v1(48.006,59.131) 48.006,59.233 48.057,59.284 R9.1@48.057,61.026 ; v1(48.768,29.972) 48.768,28.829 48.519,28.58 48.138,28.58 ; IC1.106@49.4,47.568 49.4,45.85 49.53,45.72 v1(49.53,45.466) 49.9,45.836 IC1.105@49.9,47.568 ; IC1.7@51.4,26.092 51.4,27.524 51.689,27.813 52.197,27.813 ; IC1.8@51.9,26.092 51.9,27.516 52.197,27.813 ; v1(53.086,28.575) 52.324,27.813 52.197,27.813 ; v1@53.213,28.575 54.4,27.388 IC1.13@54.4,26.092 ; v1(55.118,45.212) 55.753,45.212 56.4,45.859 IC1.92@56.4,47.568 ; v1(55.855,54.61) C53.2@56.921,54.61 ; IC1.19@57.4,26.092 57.4,27.174 v1(58.928,28.702) ; v1(61.214,45.085) 61.849,45.085 62.9,46.136 IC1.79@62.9,47.568 ; IC1.32@63.9,26.092 63.9,27.705 v1(64.135,27.94) ; v1(64.262,44.831) 66.421,44.831 ; v1(65.024,32.893) 65.151,32.766 65.151,31.696 66.267,30.58 IC1.42@67.888,30.58 ; v1(65.278,38.989) 65.278,37.846 65.544,37.58 IC1.56@67.888,37.58 ; IC1.35@65.4,26.092 65.4,27.681 v1(65.659,27.94) 65.9,27.699 IC1.36@65.9,26.092 ; IC1.70@67.888,44.58 66.672,44.58 66.421,44.831 ; IC1.71@67.888,45.08 66.67,45.08 66.421,44.831 ; v1(69.647,26.238) 69.672,26.213 C49.2@69.672,25.298 ; v1(71.12,17.653) 74.168,17.653 74.66,17.161 IC3.B4@74.692,17.161 75.184,17.653 75.184,19.355 74.784,19.755 74.784,20.069 IC3.E4@74.692,20.161 ; v1(72.136,11.049) 72.644,11.049 72.898,11.303 R27.2@74.6,11.303 ; IC3.D1@77.692,19.161 79.359,19.161 79.502,19.304 v1(79.756,19.304) ; v1(78.562,52.121) 78.715,52.273 C48.2@78.715,53.01 ; v1(83.439,39.116) 83.566,39.243 85.716,39.243 85.725,39.252 85.725,39.686 IC2.25@85.753,39.714 ; C50.1@83.602,25.959 83.602,24.932 83.693,24.841 83.693,24.536 v1(83.744,24.486) ; v1(84.201,45.593) 85.471,45.593 85.753,45.311 IC2.16@85.753,44.614 ; IC2.30@88.253,39.714 88.253,39.255 89.027,38.481 v1(90.678,38.481) ; 88.712,38.94 88.712,39.714 IC2.31@88.753,39.714 ; IC2.6@89.953,42.914 91.428,42.914 91.77,43.256 v1(92.456,43.256) ; v1(91.567,63.627) 92.837,64.897 TP1.TP@93.472,64.897 ; C51.2@92.989,49.403 92.989,49.301 93.245,49.046 93.347,49.046 93.393,48.999 93.726,48.999 v1(93.802,48.923) ; v1(99.441,47.65) 99.517,47.574 99.745,47.574 99.871,47.448 99.871,47.007 100.127,46.751 C52.1@100.228,46.751 ; X1.4@99.555,32.995 99.883,33.323 R2.1@99.883,35.941 99.883,37.399 100.076,37.592 100.076,37.871 v1(100.152,37.948)
  Component Side w0.4: v1(2.794,59.182) 2.902,59.29 J3.4@5.238,59.29 ; v1(11.496,45.593) C35.1@13.274,47.371 ; R28.2@20.028,20.409 R28.2@20.028,20.462 ; R23.2@20.142,48.006 20.447,48.006 v1(21.717,46.736) ; R26.2@20.472,63.652 22.301,63.652 v1(22.682,64.033) ; R25.2@20.599,56.947 20.599,56.845 21.679,55.766 22.034,55.766 v1(22.073,55.728) ; R24.2@20.676,52.807 21.234,52.807 v1(22.631,51.41) ; R22.2@21.488,60.985 23.571,60.985 v1(23.825,61.239)
  Component Side w0.6: R8.1@84.643,56.007 86.36,56.007 86.614,56.261 86.614,59.563 87.376,60.325 88.9,60.325 C21.1@90.424,60.325 ; C21.1@90.424,60.223 C21.1@90.424,60.325 ; v1(91.567,63.627) 90.424,62.484 C21.1@90.424,60.325 ; U1.1@97.095,60.325 C21.1@90.424,60.325
  Solder Side w0.2: C12.1@48.387,44.846 48.91,44.846 v1(49.53,45.466) ; v1(48.641,39.116) C4.1@48.641,40.625 ; C3.1@48.753,28.702 48.768,28.717 v1(48.768,29.972) ; v1(49.022,34.417) 49.022,35.702 C2.1@49.134,35.814 ; C13.1@51.816,28.814 52.72,28.814 52.959,28.575 v1(53.086,28.575) ; v1@53.198,28.687 C16.1@54.483,28.687 ; v1(55.118,45.212) C19.1@56.5,45.212 ; C23.1@57.419,28.702 v1(58.928,28.702) ; v1@61.326,44.973 C25.1@62.865,44.973 ; C29.1@62.88,28.702 63.642,27.94 v1(64.135,27.94) ; v1(64.262,44.831) 65.39,44.831 C38.1@65.532,44.973 ; v1(65.024,32.893) 65.42,32.497 C37.1@65.42,31.623 ; C39.1@65.278,37.704 v1(65.278,38.989) ; C34.1@65.42,30.099 65.42,28.179 v1(65.659,27.94) ; C32.2@68.682,19.431 68.961,19.152 68.961,17.78 69.215,17.526 70.993,17.526 v1(71.12,17.653) C33.2@72.263,18.796 ; v1(79.756,19.304) 80.289,19.304 C31.2@81.28,18.313 ; C14.1@83.454,37.592 v1@83.454,39.101 ; v1(84.201,45.593) 84.948,46.34 C26.1@85.344,46.34 ; v1(88.011,15.011) 88.036,15.037 88.062,15.037 88.289,15.264 89.279,15.264 89.84,15.824 90.678,14.986 C1.1@90.678,12.156 ; v1(88.272,12.421) 88.449,12.243 88.494,12.243 88.58,12.156 C1.1@90.678,12.156 ; C10.1@90.321,37.484 90.321,38.124 v1(90.678,38.481) ; IC4.4@92.812,12.725 91.349,12.725 90.78,12.156 C1.1@90.678,12.156
+5V: C20.1 C24.1 IC4.3 L1.2 L2.2 R14.1 SV1.1 U1.8 U2.3 | length 239.5
  Component Side w0.2: v1(12.192,15.621) 12.192,12.609 13.424,11.377 13.424,10.337 14.471,9.29 29.358,9.29 29.723,8.925 30.221,8.925 30.586,9.29 33.128,9.29 33.274,9.144 v1(33.401,9.271) ; v1(13.843,15.875) 14.097,15.621 U2.3@16.069,15.621 ; R14.1@95.819,41.62 R14.1@95.819,41.427 97.917,41.427 v1(98.171,41.173) 98.603,41.605 98.603,44.359 C24.1@98.054,44.907 C24.1@98.054,44.46
  Component Side w0.4: SV1.1@32.512,7.366 33.427,7.366 36.213,4.58 38.219,4.58 38.989,3.81 v1(94.996,3.81)
  Component Side w0.6: L2.2@58.649,61.443 58.699,61.443 58.907,61.235 58.907,60.6 59.563,59.944 v1(59.614,59.944) 62.439,59.944 65.989,63.494 65.989,66.675 67.102,67.788 94.76,67.788 100.691,61.857 102.02,61.857 ; v1(95.072,11.43) 96.241,11.43 96.266,11.405 ; v1(96.266,8.128) 96.266,11.405 ; C20.1@102.02,62.865 102.02,61.857 ; U1.8@102.311,60.325 102.02,60.616 102.02,61.857 ; v1(102.616,41.402) 102.616,41.072 103.868,39.819 103.868,25.509 101.332,22.973 101.227,22.973 96.266,18.011 96.266,11.405 ; L1.2@109.296,55.677 109.245,55.677 105.41,59.512 v1(105.41,60.452) 104.005,61.857 102.02,61.857
  Solder Side w0.2: v1(12.192,15.621) 12.446,15.875 v1(13.843,15.875) ; SV1.1@32.512,7.366 33.401,8.255 v1(33.401,9.271) ; v1(96.266,8.128) v1@96.266,8.255
  Solder Side w0.6: IC4.3@92.812,11.455 94.92,11.455 94.945,11.43 v1(95.072,11.43) ; v1(94.996,3.81) 94.996,6.985 v1@96.266,8.255 ; v1(98.171,41.173) 98.4,41.402 v1(102.616,41.402) 103.734,42.52 103.734,58.776 v1(105.41,60.452)
CAN1_H: J5.7 R35.2 | length 11.5
  Component Side w0: 103.771,22.251 R35.2@104.775,21.247
  Component Side w0.2: R35.2@104.775,21.412 107.391,21.412 108.624,22.645 J5.7@114.297,22.645
CAN1_L: J5.2 R33.2 | length 10.7
  Component Side w0.2: R33.2@102.362,21.412 102.362,22.225 103.735,23.598 110.111,23.598 110.312,23.799 111.227,23.799 J5.2@111.457,24.03
CAN2_H: J4.7 R34.2 | length 7.2
  Component Side w0.2: J4.7@5.313,29.73 R34.2@12.547,29.73
CAN2_L: J4.2 R32.2 | length 7
  Component Side w0.2: J4.2@8.153,28.345 11.66,28.345 12.662,27.343 R32.2@12.662,25.273
DGND: C1.2 C2.2 C3.2 C4.2 C5.1 C6.2 C7.2 C8.2 C9.1 C10.2 C11.2 C12.2 C13.2 C14.2 C15.2 C16.2 C17.1 C18.1 C19.2 C20.2 C21.2 C22.2 C23.2 C24.2 C25.2 C26.2 C27.2 C28.2 C29.2 C30.2 C31.1 C32.1 C33.1 C34.2 C35.2 C36.2 C37.2 C38.2 C39.2 C42.2 C43.2 C48.1 C49.1 C50.2 C51.1 C52.2 C53.1 D1.2 D2.2 IC1.6 IC1.12 IC1.14 IC1.15 IC1.16 IC1.17 IC1.18 IC1.33 IC1.34 IC1.41 IC1.55 IC1.69 IC1.80 IC1.89 IC1.104 IC1.118 IC1.128 IC1.141 IC2.1 IC2.2 IC2.33 IC3.B1 IC3.B3 IC3.C1 IC3.E5 IC4.1 IC4.2 IC4.10 J1.A1 J1.A12 J1.B1 J1.B12 J2.3 J2.5 J2.9 J3.6 J3.9 J3.10 J3.11 J3.12 J4.3 Q1.2 Q1.4 Q3.P$2 Q3.P$4 R1.2 R3.2 R4.2 R10.1 R11.1 R13.1 R20.1 R21.1 R36.1 S2.1 S2.2 SV1.5 SV1.6 U1.2 U1.3 U1.5 U1.6 U1.7 U2.2 USB1.GND X1.2 | length 273
  Component Side w0.2: 1.731,61.462 v1(2.419,61.462) 2.419,61.474 J3.6@5.436,61.474 ; J3.9@1.892,50.99 1.725,51.158 1.725,63.345 J3.10@2.614,64.234 ; v1(13.208,56.642) 13.335,56.642 13.703,57.01 J3.11@16.078,57.01 ; v1(13.208,62.357) 13.576,62.725 J3.12@16.078,62.725 ; v1(13.716,17.526) 14.351,16.891 U2.2@16.069,16.891 ; C35.2@15.189,47.371 15.189,46.152 v1(16.002,45.339) ; R36.1@20.386,25.199 19.759,25.199 19.443,25.515 C43.2@19.443,27.305 19.443,28.206 19.939,28.702 20.828,28.702 20.943,28.817 C42.2@20.943,29.718 22.098,29.718 22.225,29.845 v1(22.606,29.845) ; R1.2@39.675,29.718 42.945,29.718 43.199,29.464 v1(43.307,29.464) 43.561,29.464 43.677,29.58 IC1.141@46.412,29.58 ; v1(45.415,59.182) 45.39,59.207 45.39,59.411 45.466,59.487 R11.1@45.466,61.051 ; IC1.128@46.412,36.08 47.637,36.08 48.641,37.084 50.419,37.084 v1(50.419,37.211) ; IC1.118@46.412,41.08 49.979,41.08 50.927,40.132 v1(51.181,40.132) ; v1(49.149,42.164) 49.276,42.291 49.657,42.291 50.4,43.034 IC1.104@50.4,47.568 ; v1(50.419,30.48) 50.419,27.559 50.9,27.078 IC1.6@50.9,26.092 ; C17.1@50.434,14.986 51.41,14.986 ; v1(51.435,14.224) 51.41,14.249 51.41,14.986 ; v1(52.019,63.703) 52.045,63.729 52.121,63.729 53.111,64.719 USB1.GND@53.111,65.913 ; C18.1@52.385,14.986 51.41,14.986 ; IC1.12@53.9,26.092 53.9,24.205 54.229,23.876 54.737,23.876 54.9,24.039 IC1.14@54.9,26.092 54.9,27.341 55.88,28.321 v1(56.134,28.321) ; IC1.15@55.4,26.092 55.4,27.587 55.9,28.087 ; IC1.16@55.9,26.092 55.9,28.087 ; IC1.17@56.4,26.092 56.4,28.055 ; C27.2@56.743,15.342 56.743,14.758 57.68,13.821 ; IC1.18@56.9,26.092 56.9,27.555 56.4,28.055 ; v1(57.404,12.446) 57.15,12.7 57.15,13.29 57.68,13.821 ; IC1.89@57.9,47.568 57.9,45.097 58.039,44.958 v1(58.039,43.815) ; C53.1@58.232,54.61 59.042,54.61 59.055,54.598 59.246,54.598 v1(59.258,54.61) ; Q3.P$2@59.411,13.821 57.68,13.821 ; v1(61.214,43.18) 61.087,43.307 60.706,43.307 60.198,43.815 60.198,45.339 60.544,45.685 61.463,45.685 62.35,46.572 62.35,47.518 IC1.80@62.4,47.568 ; C30.2@61.544,63.703 R21.1@63.967,63.703 ; v1(62.84,61.976) 62.814,62.001 62.814,62.55 R21.1@63.967,63.703 ; v1(62.865,38.354) 64.139,37.08 IC1.55@67.888,37.08 ; v1(63.627,18.034) 63.373,18.034 63.147,17.808 Q3.P$4@61.824,17.808 63.224,16.408 C28.2@64.135,16.408 ; R21.1@64.084,63.718 63.983,63.718 R21.1@63.967,63.703 ; v1(64.135,43.053) 64.262,43.18 65.532,43.18 66.432,44.08 IC1.69@67.888,44.08 ; IC1.33@64.4,26.092 64.4,24.881 64.77,24.511 ; IC1.34@64.9,26.092 64.9,24.641 64.77,24.511 ; IC1.41@67.888,30.08 70.085,30.08 v1(70.485,30.48) ; C49.1@68.362,25.298 67.666,25.298 v1(66.98,24.613) 65.872,24.613 65.77,24.511 64.77,24.511 ; v1(71.755,21.082) 72.136,21.463 72.39,21.463 IC3.E5@73.692,20.161 ; IC3.B3@75.692,17.161 76.184,17.653 77.597,17.653 77.692,17.748 ; IC3.C1@77.692,18.161 77.692,17.748 ; C7.2@79.273,55.753 S2.1@79.273,58.471 ; v1(79.883,17.018) 79.74,17.161 IC3.B1@77.692,17.161 77.692,17.748 ; C48.1@80.025,53.01 80.62,53.01 v1(80.874,53.264) ; C9.1@83.998,34.808 83.847,34.658 83.847,33.718 84.244,33.321 v1(84.244,33.274) ; C50.2@84.912,25.959 84.925,25.971 v1(85.725,25.971) ; Q1.2@86.741,34.163 Q1.4@88.773,36.195 89.281,36.195 89.789,35.687 v1(90.551,35.687) ; C5.1@87.361,31.115 87.361,28.158 87.553,27.966 87.553,27.535 v1(87.63,27.458) ; v1(87.503,42.164) 89.228,40.439 89.928,40.439 IC2.1@89.953,40.414 91.214,40.414 91.44,40.64 v1(91.694,40.64) 91.42,40.914 IC2.2@89.953,40.914 ; v1(88.566,50.974) 89.002,51.41 R20.1@89.957,51.41 ; C21.2@90.424,56.871 90.424,55.118 91.059,54.483 v1(91.186,54.483) ; v1(90.856,49.416) 90.869,49.403 C51.1@91.679,49.403 ; v1(94.285,44.831) 96.063,44.831 C24.2@96.139,44.907 ; R13.1@95.184,39.116 v1(97.028,39.116) ; X1.2@95.555,27.915 95.655,27.915 96.455,28.715 96.455,29.729 96.647,29.921 v1(96.647,30.023) ; v1(100.228,44.399) C52.2@100.228,45.441 ; R10.1@106.299,44.526 106.197,44.628 v1(106.197,46.482) 106.172,46.507 106.172,48.194 R3.2@106.314,48.336 ; v1(110.439,59.741) 110.439,59.665 110.922,59.182 R4.2@110.922,58.039 ; C8.2@112.828,44.526 114.63,44.526 v1(114.656,44.501) ; 55.9,28.087 v1(56.134,28.321) ; v1(56.134,28.321) 56.4,28.055
  Component Side w0.4: v1(86.538,43.256) 86.538,43.129 v1(87.503,42.164) ; v1(94.234,56.515) 95.504,57.785 95.529,57.785 ; U1.3@97.095,57.785 95.529,57.785 ; v1(99.441,61.976) 100.203,61.214 100.203,59.055 ; U1.5@102.311,56.515 100.711,56.515 100.203,57.023 100.203,57.785 ; U1.6@102.311,57.785 100.203,57.785 ; U1.7@102.311,59.055 100.203,59.055 ; v1(102.87,64.77) 103.734,63.906 C20.2@103.734,62.865 ; 95.529,57.785 C22.2@94.615,58.699 94.971,59.055 U1.2@97.095,59.055 100.203,59.055 ; 100.203,57.785 100.203,59.055
  Solder Side w0.2: C12.2@48.387,43.536 48.387,42.926 v1(49.149,42.164) 49.708,42.723 C15.2@51.181,42.723 ; C4.2@49.936,40.64 50.444,40.132 v1(51.181,40.132) ; C3.2@50.063,28.702 50.063,29.616 50.419,29.972 v1(50.419,30.48) 50.775,30.124 C13.2@51.816,30.124 ; C2.2@50.444,35.814 v1@50.444,37.186 ; C16.2@54.483,29.997 55.728,29.997 56.134,29.591 ; v1(56.134,28.321) 56.134,29.591 ; C19.2@56.515,43.917 57.683,43.917 57.785,43.815 v1(58.039,43.815) ; C23.2@57.404,29.997 56.54,29.997 56.134,29.591 ; v1(60.833,30.226) 61.57,29.489 C29.2@61.57,28.702 ; v1(61.214,43.18) 62.382,43.18 C25.2@62.865,43.663 63.373,43.155 v1@64.237,43.155 ; v1@62.738,38.481 61.976,38.481 61.722,38.735 61.722,40.64 62.357,41.275 C36.2@63.297,41.275 ; v1(62.865,38.354) 63.094,38.354 C39.2@63.856,37.592 ; C34.2@64.11,30.099 63.246,30.099 v1(62.611,30.734) 63.5,31.623 C37.2@64.11,31.623 ; v1(64.135,43.053) v1@64.237,43.155 ; C38.2@65.532,43.663 64.745,43.663 v1@64.237,43.155 ; C32.1@69.992,19.431 70.739,19.431 71.755,20.447 v1@71.755,20.843 ; v1(71.755,21.082) v1@71.755,20.843 ; C33.1@72.263,20.335 v1@71.755,20.843 ; v1(79.883,17.018) 81.265,17.018 C31.1@81.28,17.003 ; C14.2@82.144,37.592 82.144,35.814 84.06,33.898 84.06,33.204 v1@84.066,33.198 ; C11.2@84.709,29.007 86.284,27.432 87.604,27.432 v1(87.63,27.458) ; v1(84.709,48.895) 85.344,48.26 C26.2@85.344,47.65 ; v1@87.63,27.432 89.916,27.432 91.364,28.88 C6.2@91.44,28.88 ; v1(89.814,10.49) 89.84,10.49 89.94,10.59 90.422,10.59 C1.2@90.678,10.846 90.78,10.846 91.44,10.185 IC4.2@92.812,10.185 ; v1(90.703,8.814) 90.856,8.814 90.957,8.915 IC4.1@92.812,8.915 ; v1(90.856,19.736) 91.465,20.345 IC4.10@92.812,20.345 ; C10.2@91.631,37.484 92.793,36.322 v1(93.218,36.322) v1@93.345,36.322
  other v1: 86.589,41.072 88.417,41.097 88.417,43.282
FD1_CANRX: IC1.112 IC4.5 pad.34 | length 111
  Component Side w0.2: v1(39.802,12.649) 39.284,13.167 38.232,13.167 37.519,13.881 37.519,38.347 37.611,38.44 37.611,43.422 37.988,43.799 41.432,43.799 pad.34@41.676,44.044 41.839,44.044 41.982,44.187 43.306,44.187 43.413,44.08 IC1.112@46.412,44.08 ; v1(40.259,7.772) 40.259,7.747 40.538,7.468 v1(92.431,7.468)
  Solder Side w0.2: v1(39.802,12.649) 39.796,12.643 39.796,12.477 40.259,12.014 v1(40.259,7.772) ; v1(92.431,7.468) 93.494,7.468 96.66,10.633 96.66,12.865 95.529,13.995 IC4.5@92.812,13.995
FD1_CANTX: IC1.113 IC4.7 pad.35 | length 114.8
  Component Side w0.2: v1(38.481,13.767) 38.481,24.29 37.919,24.853 37.919,38.181 38.011,38.274 38.011,43.256 38.154,43.399 41.598,43.399 41.679,43.48 41.972,43.48 42.129,43.637 pad.35@43.078,43.637 IC1.113@46.412,43.58 ; v1(39.065,7.264) 39.065,7.163 39.599,6.629 v1(93.504,6.629)
  Solder Side w0.2: v1(38.481,13.767) 38.532,13.767 39.065,13.233 v1(39.065,7.264) ; IC4.7@92.812,16.535 95.86,16.535 96.444,15.951 96.444,13.668 97.06,13.052 97.06,10.185 v1(93.504,6.629)
FD1_STBM: IC1.115 IC4.8 pad.67 R29.1 | length 124.6
  Component Side w0.2: v1(37.008,42.113) 37.008,38.624 37.119,38.513 37.119,13.554 v1(38.227,12.446) ; v1(38.354,6.096) 66.112,6.096 66.179,6.029 96.65,6.029 96.761,5.918 v1(97.485,5.918) ; v1(38.989,42.088) 40.269,42.088 40.473,42.291 pad.67@41.275,42.291 41.564,42.58 IC1.115@46.412,42.58
  Solder Side w0.2: v1(37.008,42.113) 37.033,42.088 v1(38.989,42.088) ; v1(38.227,12.446) 38.227,6.223 v1(38.354,6.096) ; R29.1@89.738,17.739 89.804,17.805 IC4.8@92.812,17.805 96.749,17.805 97.46,17.094 97.46,5.944 v1(97.485,5.918)
FD2_CANRX: IC1.20 U2.4 | length 61.4
  Component Side w0.2: U2.4@16.069,14.351 14.605,14.351 14.224,13.97 14.224,10.668 14.797,10.095 28.441,10.095 29.249,10.903 44.812,10.903 47.244,13.335 54.61,13.335 55.08,13.805 55.08,21.159 57.9,23.979 IC1.20@57.9,26.092
FD2_CANTX: IC1.21 U2.1 | length 69.2
  Component Side w0.2: 13.808,11.635 13.116,12.327 13.116,15.84 12.319,16.637 12.319,18.034 13.208,18.923 14.351,18.923 U2.1@15.113,18.161 ; 13.824,11.619 13.824,10.502 14.631,9.695 28.745,9.695 29.464,10.414 44.958,10.414 47.371,12.827 55.245,12.827 55.48,13.062 55.48,20.994 58.4,23.914 IC1.21@58.4,26.092
FD2_STBM: IC1.22 R28.1 U2.8 | length 72.9
  Component Side w0.2: U2.8@21.285,18.161 21.628,18.504 21.628,21.806 21.209,22.225 19.558,22.225 18.542,21.209 18.542,14.979 23.026,10.495 28.275,10.495 29.718,11.938 v1(29.718,12.192) ; v1(29.972,9.525) 30.461,10.014 45.124,10.014 46.413,11.303 55.499,11.303 55.88,11.684 55.88,20.828 58.9,23.848 IC1.22@58.9,26.092
  Solder Side w0.2: v1(29.718,12.192) 29.591,12.065 29.972,11.684 v1(29.972,9.525)
GND: C44.2 C45.2 C46.2 C47.2 IC4.11 IC4.12 IC4.15 J5.3 L3.1 R37.1 | length 8.8
  Component Side w0.2: v1(99.949,11.43) C44.2@99.949,13.22 100.469,13.22 101.461,14.212 C45.2@102.235,14.212 104.302,14.212 R37.1@104.864,13.65 ; v1(104.877,15.621) 104.877,15.513 105.08,15.31 R37.1@105.08,14.26
JTCLK: IC1.107 J2.4 R11.2 | length 20.1
  Component Side w0.2: J2.4@45.11,66.04 45.11,65.783 45.466,65.427 R11.2@45.466,62.967 45.568,62.967 46.66,61.874 46.66,57.709 48.9,55.469 IC1.107@48.9,47.568
JTDI: IC1.108 J2.8 R7.2 | length 24.3
  Component Side w0.2: J2.8@42.57,66.04 42.457,65.927 42.457,65.165 41.427,64.135 40.783,64.135 40.665,64.018 40.665,63.271 R7.2@40.411,63.017 40.513,63.017 41.543,61.988 41.543,58.076 43.917,55.702 45.974,55.702 46.294,55.382 46.294,52.004 48.4,49.898 IC1.108@48.4,47.568
JTDO: IC1.130 J2.6 R12.2 | length 48.2
  Component Side w0.2: J2.6@43.84,66.04 43.84,63.932 42.926,63.017 R12.2@42.824,63.017 43.129,62.713 43.926,62.713 44.044,62.595 44.044,57.201 v1(44.145,57.099)
  Component Side w0.254: v1(35.458,36.703) 35.382,36.703 35.001,37.084 35.001,50.025 37.881,52.905 39.062,52.905 41.881,55.724 41.881,55.934 v1(41.859,55.956) ; v1(39.062,36.503) 40.485,35.08 IC1.130@46.412,35.08
  Solder Side w0.254: v1(35.458,36.703) 38.862,36.703 v1(39.062,36.503) ; v1(41.859,55.956) 43.586,55.956 44.145,56.515 v1(44.145,57.099)
JTMS: IC1.102 J2.2 R9.2 | length 22.3
  Component Side w0.2: J2.2@46.38,66.04 48.057,64.364 R9.2@48.057,62.941 49.327,62.941 50.424,61.844 50.424,54.067 49.657,53.3 49.657,49.784 50.257,49.184 50.813,49.184 51.35,48.647 51.35,47.618 IC1.102@51.4,47.568
LED0: IC1.3 R17.1 | length 101.7
  Component Side w0.2: v1(48.006,14.351) 48.006,18.923 49.4,20.317 IC1.3@49.4,26.092 ; v1(51.308,9.906) 51.373,9.841 85.134,9.841 85.184,9.89 92.853,9.89 95.758,6.985 96.901,6.985 97.917,8.001 97.917,18.814 101.476,22.373 101.58,22.373 104.486,25.278 104.486,38.865 R17.1@105.499,39.878
  Solder Side w0.2: v1(48.006,14.351) 48.26,14.097 48.26,12.573 50.927,9.906 v1(51.308,9.906)
LED1: IC1.2 R19.1 | length 60.3
  Component Side w0.2: R19.1@10.452,11.303 10.452,9.614 11.176,8.89 29.193,8.89 29.558,8.525 49.038,8.525 49.53,9.017 v1(49.53,9.779) ; v1(47.068,15.416) 47.009,15.475 47.009,19.069 48.9,20.96 IC1.2@48.9,26.092
  Solder Side w0.2: v1(47.068,15.416) 47.068,14.077 47.371,13.774 47.371,11.938 v1(49.53,9.779)
NetC5_2: C5.2 IC2.28 Q1.3 R5.1 R6.2 | length 33.3
  Component Side w0.2: R6.2@85.674,31.369 85.674,31.42 86.741,32.487 88.621,32.487 88.773,32.639 ; IC2.28@87.253,39.714 87.303,39.664 87.303,37.665 87.503,37.465 89.916,37.465 90.297,37.084 90.805,37.084 90.892,36.997 90.892,36.54 91.302,36.13 91.759,36.13 91.821,36.068 91.821,35.306 90.678,34.163 Q1.3@88.873,34.163 ; C5.2@88.773,31.217 88.773,32.639 ; v1(90.195,33.02) 90.119,33.097 89.939,33.097 Q1.3@88.873,34.163 ; v1(94.513,30.912) 94.255,30.653 94.255,26.89 95.364,25.781 R5.1@96.985,25.781 ; 88.773,32.639 Q1.3@88.773,34.163 Q1.3@88.873,34.163
  Solder Side w0.2: v1(90.195,33.02) 90.304,33.02 90.431,33.147 90.449,33.147 90.795,33.493 92.197,33.493 93.317,32.373 93.317,32.109 v1(94.513,30.912)